# EAGLE board board (EAGLE 9.7.0)

Size 68.48 x 52.79 mm. Coordinates in mm from the lower left corner, seen from the top.
Outline: 0,0 68.48,0 68.48,52.78 0,52.78 0,0
Copper layers (1*16): Top 0.035mm / dielectric 1.5mm / Bottom 0.035mm
Design rules "default": minimum track width 6mil, minimum drill 0.35mm, track to track 6mil, track to pad 6mil, pad to pad 6mil, via to via 6mil, smd to smd 6mil, copper to edge 40mil, drill to drill 6mil, minimum pad ring 10mil, minimum via ring 8mil, stop-mask expansion 4mil, vias tented up to drill 0mil, thermal gap 10mil

## Footprints (pad centres in the part's own frame; a part is rotated, then mirrored left to right if it is on the bottom)
LEDRD254W60D565H860B = drill 0.981 pad 1.581: 1 -1.27,0; 2 1.27,0
BATTERY-GENERIC = drill 1.118 pad 3.15 octagon: + 2.54,0; - -2.54,0
RESAD1016W63L850D250B = drill 0.83 pad 1.43: 1 -5.08,0; 2 5.08,0
78B04ST = drill 0.8: 1 -3.81,-3.81; 2 -1.27,-3.81; 3 1.27,-3.81; 4 3.81,-3.81; 5 3.81,3.81; 6 1.27,3.81; 7 -1.27,3.81; 8 -3.81,3.81
DIP762W53P254L1969H508Q14B = drill 0.743 pad 1.343: 1 -3.81,7.62; 2 -3.81,5.08; 3 -3.81,2.54; 4 -3.81,0; 5 -3.81,-2.54; 6 -3.81,-5.08; 7 -3.81,-7.62; 8 3.81,-7.62; 9 3.81,-5.08; 10 3.81,-2.54; 11 3.81,0; 12 3.81,2.54; 13 3.81,5.08; 14 3.81,7.62

## Placement (x,y rotation side)
D2  RED  [LEDRD254W60D565H860B]  60.43,28.02 270 top
P1  BATTERYGENERIC  [BATTERY-GENERIC]  8.26,28.13 180 top
R1  10k  [RESAD1016W63L850D250B]  35.03,8.97 90 top
R2  1k  [RESAD1016W63L850D250B]  60.43,8.97 90 top
R3  10k  [RESAD1016W63L850D250B]  37.57,8.97 90 top
SW1  SPST-478B04ST  [78B04ST]  56.62,43.26 0 top
U2  74HC32_PDIP  [DIP762W53P254L1969H508Q14B]  42.65,25.48 90 top

## Library data of the parts
D2 = Tinkercad; CATEGORY: Opto-Electronic; SUB-CATEGORY: LED; VALUE: LED_RED
P1 R1-R3 SW1 U2 = Tinkercad

## Nets
D2_C: D2.2 R2.2
P1+: P1.+ SW1.5 SW1.6 SW1.7 SW1.8 U2.14
P1-: P1.- R1.1 R2.1 R3.1 U2.7
U2_1A: R1.2 SW1.1 U2.1
U2_1B: R3.2 SW1.2 U2.2
U2_1Y: D2.1 SW1.4 U2.3

## Tracks (layer width: path | path; a pad name or v marks a point on that pad's centre or on a via)
D2_C  (1 unrouted)
P1+  (5 unrouted)
P1-  (4 unrouted)
U2_1A  (2 unrouted)
U2_1B  (2 unrouted)
U2_1Y  (2 unrouted)